# Altium PCB NB3000XN.PcbDoc (part 48 of 71)
Units mil, origin at the board's own origin, x right, y up, seen from the top; angles counter-clockwise.
Board outline 9527.56 x 6929.77 mil, 6 copper layers (Top Layer, GND+SHIELD, MidLayer1, MidLayer2, P2 - 3V3+5V0, Bottom Layer), stack 62.375 mil thick; 832 components, 1027 nets, 4655 pads, 4981 vias.
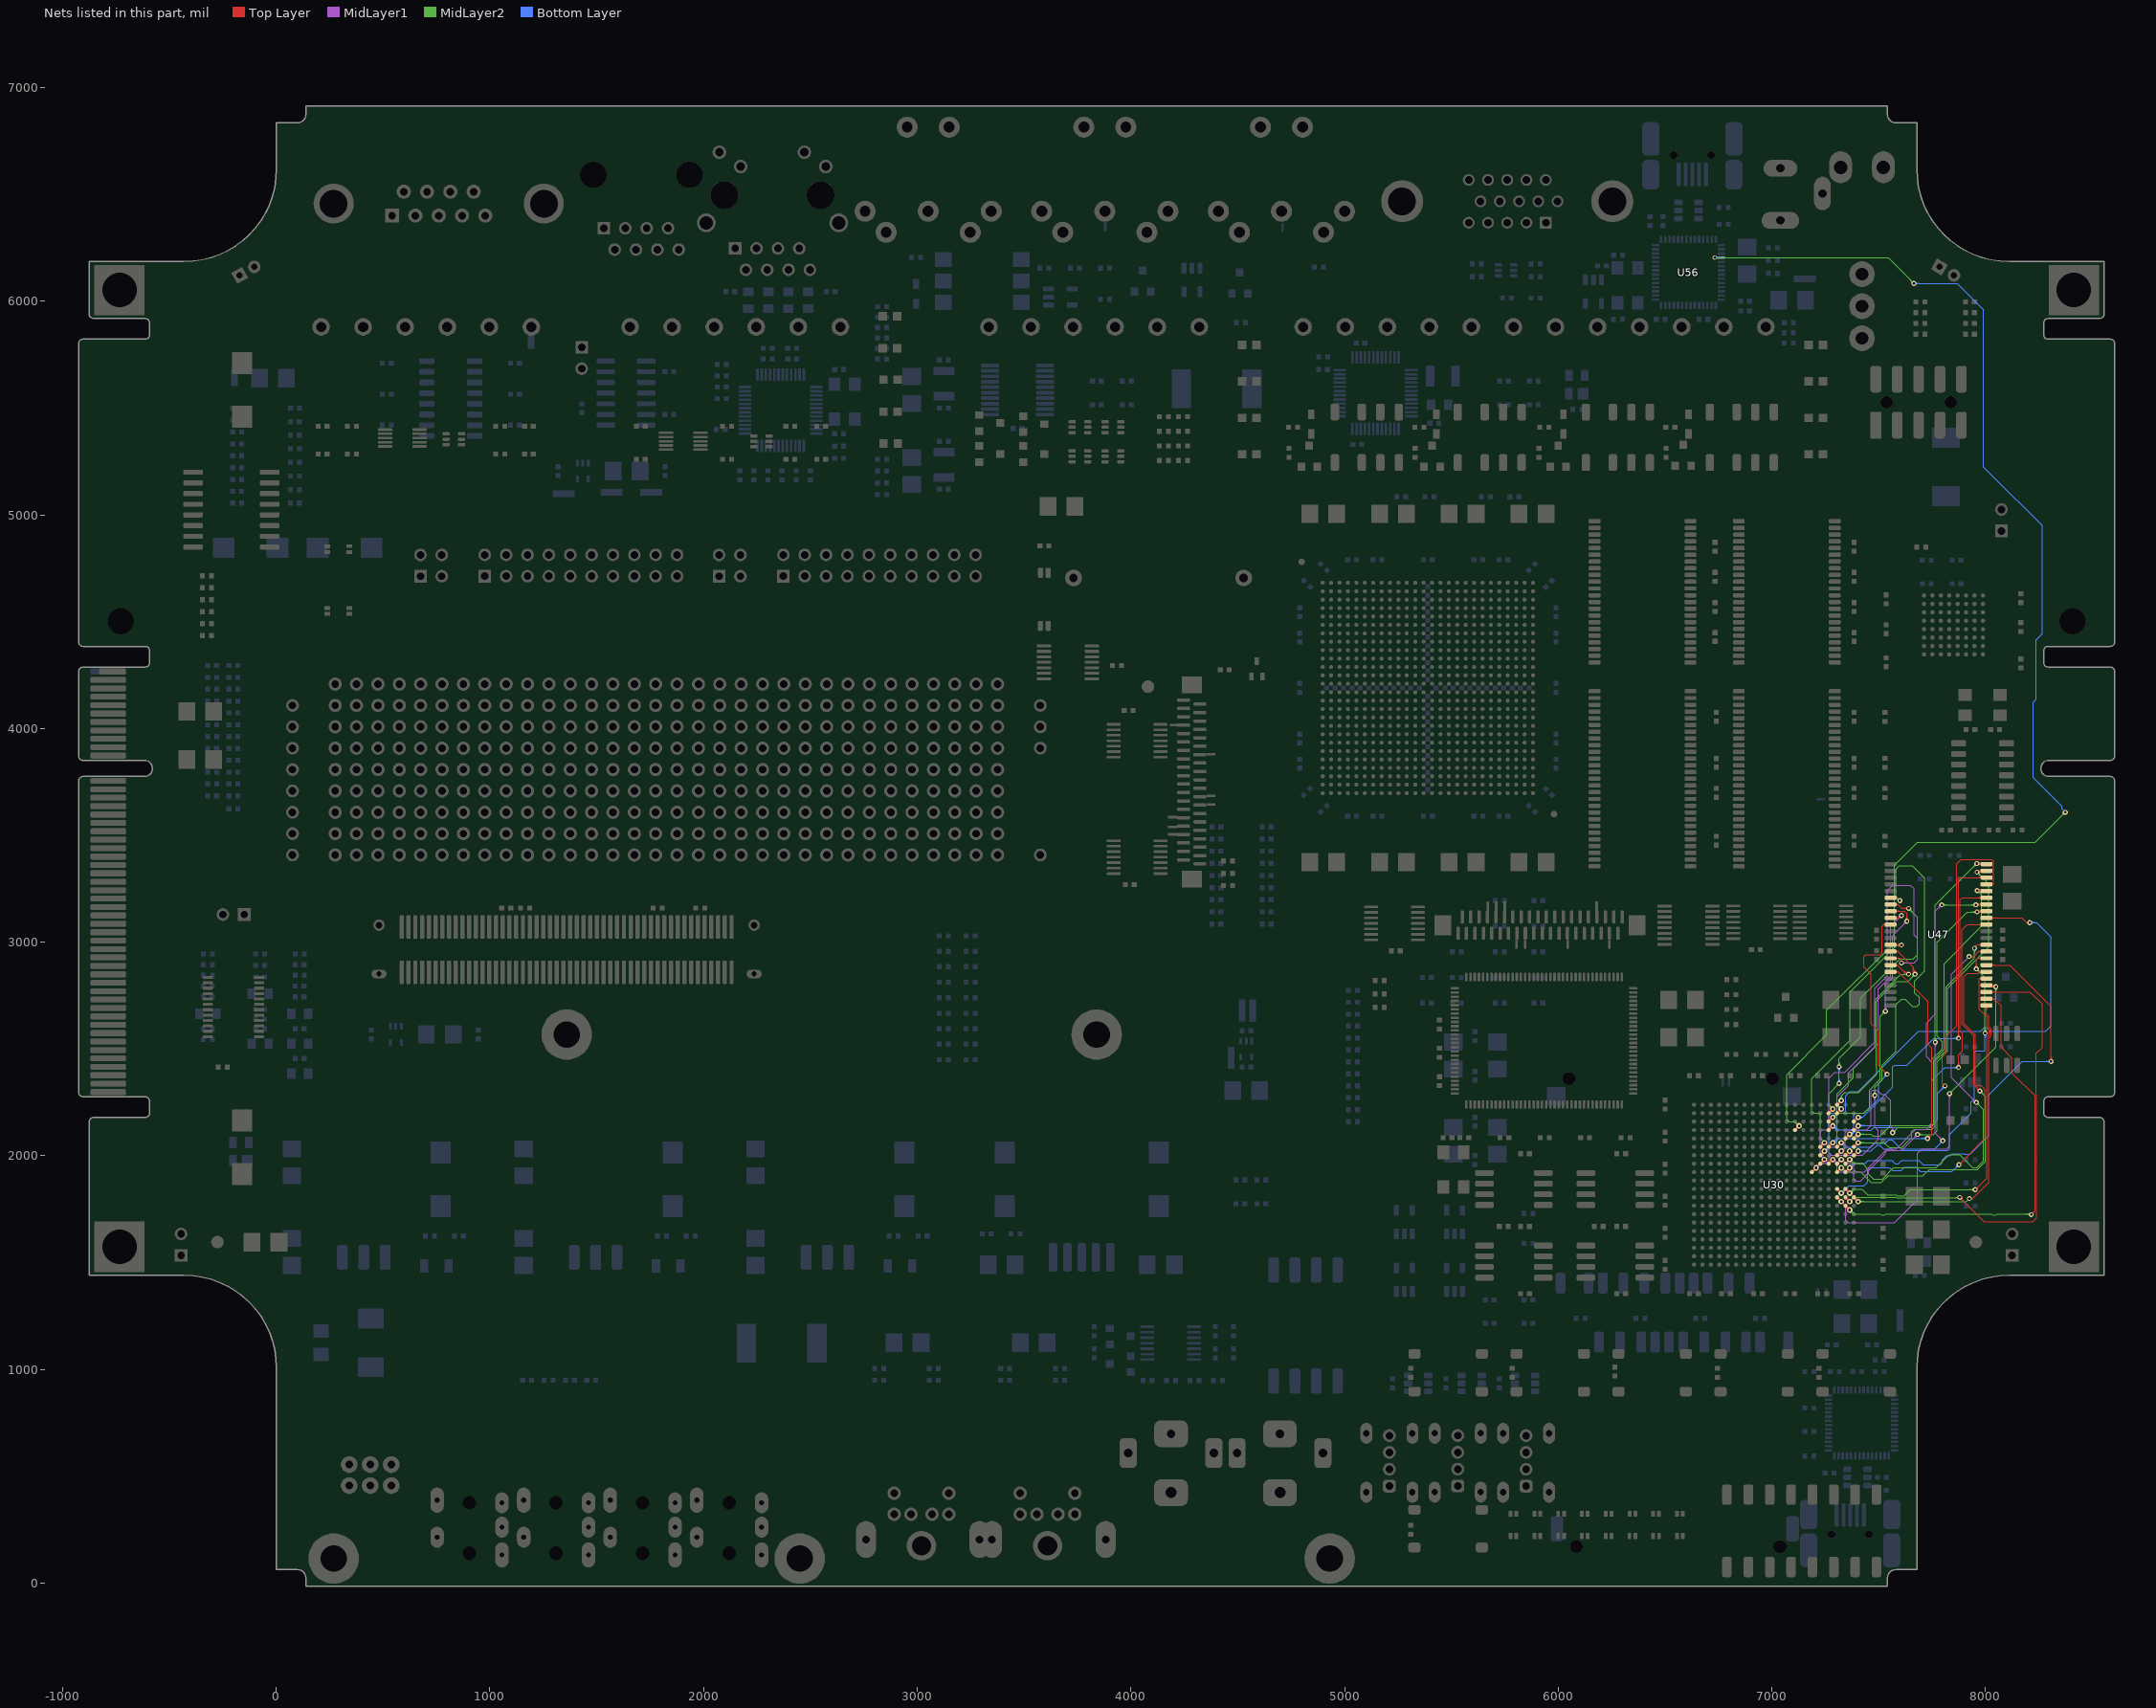
[diagram p52: the nets of this part, all layers, seen from the top]

## Via types
v1: diameter 23, hole 11.81, Top Layer to Bottom Layer, 3672 vias
v2: diameter 26, hole 11.81, Top Layer to Bottom Layer, 461 vias
v3: diameter 19, hole 11.81, Top Layer to Bottom Layer, tented both sides, 396 vias
v4: diameter 23.62, hole 11.81, Top Layer to Bottom Layer, 288 vias
v5: diameter 20, hole 11.81, Top Layer to Bottom Layer, 91 vias
v6: diameter 23, hole 11.81, Top Layer to Bottom Layer, tented both sides, 50 vias
v7: diameter 31, hole 11.81, Top Layer to Bottom Layer, 15 vias
v8: diameter 27.56, hole 11.81, Top Layer to Bottom Layer, tented both sides, 4 vias
v9: diameter 29, hole 11.81, Top Layer to Bottom Layer, 3 vias
v10: diameter 21, hole 11.81, Top Layer to Bottom Layer, 1 vias

## Nets (pads, with @x,y where several pads share a name; then routed paths per layer and width w, separated by ;. In a path a pad name is that pad's centre, name@x,y a point inside that pad or via, vN(x,y) a via of type N, cw(c..) or ccw(c..) an arc to the next point about the centre after c; other vN are vias at no path point) (continued)
HOST_SRAM.A10: U30.A12 U47.23 | length 1673.8
  Top Layer w4: v1(7924.52,1800.04) 7940.19,1800.04 8015.19,1875.04 8015.19,2551.39 8026.19,2562.39 8026.19,2593.36 8015.19,2604.36 8015.19,2652.98 8004.41,2663.76 U47.23@8004.41,2704.29 ; U47.23@7998.75,2698.64 cw(c7985.1,2684.98) 8004.41,2684.98 cw(c8023.72,2684.98) U47.23@8010.07,2698.64
  Top Layer w8: U30.A12@7384.02,1800.1 cw(c7384.02,1786) 7393.99,1795.97 cw(c7403.96,1805.94) U30.A12@7389.86,1805.94 ; U30.A12@7384.02,1805.94 v2(7403.7,1786.26) ; v2@7394.7,1786.26 ccw(c7372.97,1786.26) 7388.34,1801.62 ccw(c7403.7,1816.99) v2@7403.7,1795.26
  MidLayer2 w4: v2(7403.7,1786.26) 7910.74,1786.26 v1(7924.52,1800.04) ; v2@7408.65,1781.31 cw(c7420.6,1769.36) 7420.6,1786.26 cw(c7420.6,1803.16) v2@7408.65,1791.21 ; v2@7411.48,1778.48 cw(c7430.26,1759.7) 7430.26,1786.26 cw(c7430.26,1812.82) v2@7411.48,1794.04
HOST_SRAM.A11: U30.B13 U47.24 | length 2286.6
  Top Layer w4: U47.24@8004.41,2735.79 8038.52,2735.79 ; U47.24@8028.24,2730.82 cw(c8038.52,2722.66) 8038.52,2735.79 ; U47.24@8028.24,2740.76 ccw(c8038.52,2748.92) 8038.52,2735.79 ; v1(8213.86,1725.04) 8231.86,1743.04 8231.86,2280.52 8123.52,2388.85 8123.52,2458.37 8073.52,2508.37 8073.52,2700.79 8038.52,2735.79 ; v1@8213.86,1730.54 ccw(c8213.86,1743.82) 8223.25,1734.43 ccw(c8232.64,1725.04) v1@8219.36,1725.04 ; v1@8213.86,1734.54 ccw(c8213.86,1757.48) 8230.07,1741.26 ccw(c8246.29,1725.04) v1@8223.36,1725.04
  Top Layer w8: U30.B13@7344.65,1760.73 cw(c7344.65,1746.63) 7354.62,1756.6 cw(c7364.59,1766.57) U30.B13@7350.49,1766.57 ; U30.B13@7344.65,1766.57 v2(7364.33,1746.89) ; v2@7355.33,1746.89 ccw(c7333.6,1746.89) 7348.97,1762.25 ccw(c7364.33,1777.62) v2@7364.33,1755.89
  MidLayer2 w4: v2@7364.33,1735.89 cw(c7364.33,1709.33) 7383.11,1728.11 cw(c7401.89,1746.89) v2@7375.33,1746.89 ; v2@7364.33,1739.89 cw(c7364.33,1722.99) 7376.28,1734.94 cw(c7388.23,1746.89) v2@7371.33,1746.89 ; v2(7364.33,1746.89) 7383.51,1727.71 7507.1,1727.71 7512.62,1722.19 7527.38,1722.19 7532.9,1727.71 8027.1,1727.71 8032.62,1722.19 8047.38,1722.19 8052.9,1727.71 8211.19,1727.71 v1(8213.86,1725.04) ; 8184.48,1727.71 cw(c8184.48,1695.67) v1@8207.14,1718.32 ; 8194.14,1727.71 cw(c8194.14,1705.32) v1@8209.97,1721.15 ; 8197.36,1727.71 ccw(c8197.36,1741.54) v1@8207.14,1731.76
HOST_SRAM.A12: U30.B12 U47.25 | length 2457.9
  Top Layer w4: v1@7879.86,1795.87 cw(c7879.86,1772.94) 7896.07,1789.16 cw(c7912.29,1805.37) v1@7889.36,1805.37 ; v1@7879.86,1799.87 cw(c7879.86,1786.6) 7889.25,1795.99 cw(c7898.64,1805.37) v1@7885.36,1805.37 ; v1(7879.86,1805.37) 7993.52,1691.71 8221.86,1691.71 8240.19,1710.04 8240.19,1977.41 8240.03,1977.57 8240.03,1989.17 8240.19,1989.34 8240.19,2283.5 8237,2286.69 8237,2479.85 8265.19,2508.04 8265.19,2709.81 8207.72,2767.28 U47.25@8004.41,2767.28 ; U47.25@8027.63,2761.63 cw(c8041.28,2747.97) 8041.28,2767.28 cw(c8041.28,2786.6) U47.25@8027.63,2772.94
  Top Layer w8: U30.B12@7344.65,1800.1 cw(c7344.65,1786) 7354.62,1795.97 cw(c7364.59,1805.94) U30.B12@7350.49,1805.94 ; U30.B12@7344.65,1805.94 v2(7364.33,1786.26) ; v2@7355.33,1786.26 ccw(c7333.6,1786.26) 7348.97,1801.62 ccw(c7364.33,1816.99) v2@7364.33,1795.26
  MidLayer2 w4: v2(7364.33,1786.26) 7364.56,1786.26 7383.67,1805.37 7583.12,1805.37 7584.31,1804.19 7878.67,1804.19 v1(7879.86,1805.37) ; 7854.06,1804.19 ccw(c7854.06,1831.17) v1@7873.14,1812.09 ; 7859.78,1804.19 cw(c7859.78,1785.3) v1@7873.14,1798.66 ; 7863.72,1804.19 ccw(c7863.72,1821.52) v1@7875.97,1809.26
HOST_SRAM.A13: U30.C12 U47.26 | length 2133.8
  Top Layer w4: U47.26@8004.41,2798.78 v1@8041.12,2798.78 ; U47.26@8007.71,2798.78 cw(c8007.71,2750.56) v1@8041.81,2784.66 ; U47.26@8017.37,2798.78 cw(c8017.37,2760.22) v1@8044.64,2787.49 ; U47.26@8027.03,2798.78 cw(c8027.03,2769.88) v1@8047.46,2790.31 ; U47.26@8027.66,2793.16 cw(c8041.12,2779.86) v1@8041.12,2798.78 ; U47.26@8027.66,2804.4 ccw(c8041.12,2817.7) v1@8041.12,2798.78 ; 8036.68,2798.78 cw(c8036.68,2779.53) v1@8050.29,2793.14 ; v1(8048.52,2791.37) v1@8041.12,2798.78
  Top Layer w8: U30.C12@7305.28,1800.1 cw(c7305.28,1786) 7315.25,1795.97 cw(c7325.22,1805.94) U30.C12@7311.12,1805.94 ; U30.C12@7305.28,1805.94 v2(7324.96,1786.26) ; v2@7315.96,1786.26 ccw(c7294.23,1786.26) 7309.6,1801.62 ccw(c7324.96,1816.99) v2@7324.96,1795.26
  MidLayer1 w4: v2(7324.96,1786.26) 7344.51,1766.71 7345.33,1765.89 7345.33,1699.65 7356.46,1688.52 7574.67,1688.52 7681.86,1795.71 7681.86,2011.71 7703.52,2033.37 7819.19,2033.37 7831.86,2046.04 v1(7831.86,2291.71) ; v1@7825.14,2284.99 cw(c7808.92,2268.77) 7831.86,2268.77 cw(c7854.79,2268.77) v1@7838.57,2284.99 ; v1@7827.97,2287.82 cw(c7818.58,2278.43) 7831.86,2278.43 cw(c7845.14,2278.43) v1@7835.75,2287.82
  MidLayer2 w4: v1(7831.86,2291.71) 8048.52,2508.37 v1(8048.52,2791.37) ; v1@7831.86,2297.21 ccw(c7831.86,2310.49) 7841.25,2301.1 ccw(c7850.64,2291.71) v1@7837.36,2291.71 ; v1@7831.86,2301.21 ccw(c7831.86,2324.14) 7848.07,2307.93 ccw(c7864.29,2291.71) v1@7841.36,2291.71 ; v1@8041.81,2784.66 cw(c8025.59,2768.44) 8048.52,2768.44 cw(c8071.46,2768.44) v1@8055.24,2784.66 ; v1@8044.64,2787.49 cw(c8035.25,2778.1) 8048.52,2778.1 cw(c8061.8,2778.1) v1@8052.41,2787.49
HOST_SRAM.A14: U30.B11 U47.27 | length 1976.1
  Top Layer w4: v1(7951.86,1841.71) 8006.86,1896.71 8006.86,2554.37 8017.86,2565.37 8017.86,2590.37 8006.86,2601.37 8006.86,2650 7970.19,2686.67 7970.19,2828.61 7971.86,2830.28 ; v1@7951.86,1847.21 ccw(c7951.86,1860.49) 7961.25,1851.1 ccw(c7970.64,1841.71) v1@7957.36,1841.71 ; v1@7951.86,1851.21 ccw(c7951.86,1874.14) 7968.07,1857.93 ccw(c7984.29,1841.71) v1@7961.36,1841.71 ; U47.27@7980.2,2825.82 ccw(c7971.86,2820.23) 7971.86,2830.28 ; U47.27@7980.2,2834.73 cw(c7971.86,2840.32) 7971.86,2830.28 ; U47.27@8004.41,2830.28 7971.86,2830.28
  Top Layer w8: U30.B11@7344.65,1839.47 cw(c7344.65,1825.37) 7354.62,1835.34 cw(c7364.59,1845.31) U30.B11@7350.49,1845.31 ; U30.B11@7344.65,1845.31 v2(7364.33,1825.63) ; v2@7355.33,1825.63 ccw(c7333.6,1825.63) 7348.97,1840.99 ccw(c7364.33,1856.36) v2@7364.33,1834.63
  MidLayer2 w4: v2(7364.33,1825.63) 7383.7,1845 7420.23,1845 7428.18,1837.05 7448.52,1816.71 7583.1,1816.71 7587.62,1812.19 7619.01,1812.19 7648.52,1841.71 v1(7951.86,1841.71) ; v2@7364.33,1832.63 ccw(c7364.33,1849.53) 7376.28,1837.58 ccw(c7388.23,1825.63) v2@7371.33,1825.63 ; v2@7364.33,1836.63 ccw(c7364.33,1863.19) 7383.11,1844.41 ccw(c7401.89,1825.63) v2@7375.33,1825.63 ; v1@7945.14,1834.99 ccw(c7928.92,1818.77) 7928.92,1841.71 ccw(c7928.92,1864.64) v1@7945.14,1848.43 ; v1@7947.97,1837.82 ccw(c7938.58,1828.43) 7938.58,1841.71 ccw(c7938.58,1854.99) v1@7947.97,1845.6
HOST_SRAM.A15: U30.A3 U47.42 | length 1813.2
  Top Layer w4: v1@7866.81,2556.76 ccw(c7850.59,2572.98) 7873.52,2572.98 ccw(c7896.46,2572.98) v1@7880.24,2556.76 ; v1@7869.64,2553.93 ccw(c7860.25,2563.32) 7873.52,2563.32 ccw(c7886.8,2563.32) v1@7877.41,2553.93 ; v1(7873.52,2550.04) 7873.52,3215 7873.52,3298.52 7877.72,3302.72 U47.42@8004.41,3302.72 ; U47.42@7981.19,3297.06 ccw(c7967.54,3283.4) 7967.54,3302.72 ccw(c7967.54,3322.03) U47.42@7981.19,3308.37
  Top Layer w8: U30.A3@7384.02,2160.28 v2(7403.7,2179.96) ; U30.A3@7384.02,2166.12 ccw(c7384.02,2180.22) 7393.99,2170.25 ccw(c7403.96,2160.28) U30.A3@7389.86,2160.28 ; v2@7394.7,2179.96 cw(c7372.97,2179.96) 7388.34,2164.6 cw(c7403.7,2149.23) v2@7403.7,2170.96
  Bottom Layer w4: v2(7403.7,2179.96) 7423.52,2179.96 ; v2@7413.03,2174.14 cw(c7423.52,2167.6) 7423.52,2179.96 ; v2@7413.03,2185.78 ccw(c7423.52,2192.32) 7423.52,2179.96 ; v1@7866.81,2543.32 ccw(c7850.59,2527.11) 7850.59,2550.04 ccw(c7850.59,2572.98) v1@7866.81,2556.76 ; v1@7869.64,2546.15 ccw(c7860.25,2536.76) 7860.25,2550.04 ccw(c7860.25,2563.32) v1@7869.64,2553.93 ; v1(7873.52,2550.04) 7756.86,2550.04 7631.86,2425.04 7573.52,2425.04 7565.19,2416.71 7565.19,2321.63 7423.52,2179.96
HOST_SRAM.A16: U30.D8 U47.43 | length 2485.4
  Top Layer w4: v1(7959.86,3328.04) 7966.03,3334.21 U47.43@8004.41,3334.21 ; v1@7960.92,3326.98 cw(c7978.38,3309.52) U47.43@7978.38,3334.21 ; v1@7963.75,3324.15 cw(c7988.04,3299.86) U47.43@7988.04,3334.21 ; v1@7966.57,3321.32 cw(c7997.69,3290.21) U47.43@7997.69,3334.21 ; U47.43@7981.19,3328.56 ccw(c7967.54,3314.9) 7967.54,3334.21 ccw(c7967.54,3353.53) U47.43@7981.19,3339.87
  Top Layer w8: U30.D8@7265.91,1963.43 v2(7285.59,1983.11) ; U30.D8@7265.91,1969.27 ccw(c7265.91,1983.37) 7275.88,1973.4 ccw(c7285.85,1963.43) U30.D8@7271.75,1963.43 ; v2@7276.59,1983.11 cw(c7254.86,1983.11) 7270.23,1967.75 cw(c7285.59,1952.38) v2@7285.59,1974.11
  MidLayer1 w4: v2@7285.59,1972.11 cw(c7285.59,1945.55) 7304.37,1964.33 cw(c7323.15,1983.11) v2@7296.59,1983.11 ; v2@7285.59,1976.11 cw(c7285.59,1959.21) 7297.54,1971.16 cw(c7309.49,1983.11) v2@7292.59,1983.11 ; v2(7285.59,1983.11) 7305.86,1962.84 7305.86,1925.04 7306.19,1924.71 7373.52,1924.71 7383.52,1914.71 7383.52,1891.71 7391.86,1883.37 7415.19,1883.37 7453.52,1921.71 7453.52,1932.37 7529.88,2008.73 7529.88,2013.78 7541.15,2025.04 7606.86,2025.04 v1(7681.86,2100.04) ; v1@7672.36,2100.04 cw(c7649.42,2100.04) 7665.64,2083.82 cw(c7681.86,2067.61) v1@7681.86,2090.54 ; v1@7676.36,2100.04 cw(c7663.08,2100.04) 7672.47,2090.65 cw(c7681.86,2081.26) v1@7681.86,2094.54
  MidLayer2 w4: v1(7681.86,2100.04) 7755,2100.04 7773.19,2118.23 7773.19,2440.77 7823.52,2491.1 7823.52,2784.71 8015.19,2976.37 8015.19,3272.71 v1(7959.86,3328.04) ; v1@7685.75,2096.15 cw(c7695.14,2086.76) 7695.14,2100.04 cw(c7695.14,2113.32) v1@7685.75,2103.93 ; v1@7688.57,2093.32 cw(c7704.79,2077.11) 7704.79,2100.04 cw(c7704.79,2122.98) v1@7688.57,2106.76 ; v1@7959.86,3318.54 cw(c7959.86,3295.61) 7976.07,3311.82 cw(c7992.29,3328.04) v1@7969.36,3328.04 ; v1@7959.86,3322.54 cw(c7959.86,3309.26) 7969.25,3318.65 cw(c7978.64,3328.04) v1@7965.36,3328.04
HOST_SRAM.A17: U30.C6 U47.44 | length 2489.4
  Top Layer w4: v1(7959.52,3368.37) 7962.19,3365.71 U47.44@8004.41,3365.71 ; v1@7963.41,3372.26 ccw(c7979.24,3388.09) U47.44@7979.24,3365.71 ; v1@7966.24,3361.66 cw(c7976.02,3351.88) 7976.02,3365.71 ; v1@7966.24,3375.09 ccw(c7988.9,3397.75) U47.44@7988.9,3365.71 ; U47.44@7981.19,3360.05 ccw(c7967.54,3346.39) 7967.54,3365.71 ccw(c7967.54,3385.02) U47.44@7981.19,3371.37
  Top Layer w8: U30.C6@7305.28,2042.17 v2(7324.96,2061.85) ; U30.C6@7305.28,2048.01 ccw(c7305.28,2062.11) 7315.25,2052.14 ccw(c7325.22,2042.17) U30.C6@7311.12,2042.17 ; v2@7315.96,2061.85 cw(c7294.23,2061.85) 7309.6,2046.49 cw(c7324.96,2031.12) v2@7324.96,2052.85
  MidLayer1 w4: v1@7758.47,2524.99 cw(c7742.26,2508.77) 7765.19,2508.77 cw(c7788.13,2508.77) v1@7771.91,2524.99 ; v1@7761.3,2527.82 cw(c7751.91,2518.43) 7765.19,2518.43 cw(c7778.47,2518.43) v1@7769.08,2527.82 ; v1(7765.19,2531.71) 7765.19,2106.37 v1(7800.52,2071.04) ; v1@7791.02,2071.04 ccw(c7768.09,2071.04) 7784.31,2087.26 ccw(c7800.52,2103.48) v1@7800.52,2080.54 ; v1@7795.02,2071.04 ccw(c7781.75,2071.04) 7791.14,2080.43 ccw(c7800.52,2089.82) v1@7800.52,2076.54
  MidLayer2 w4: v1@7758.47,2538.43 ccw(c7742.26,2554.64) 7765.19,2554.64 ccw(c7788.13,2554.64) v1@7771.91,2538.43 ; v1@7761.3,2535.6 ccw(c7751.91,2544.99) 7765.19,2544.99 ccw(c7778.47,2544.99) v1@7769.08,2535.6 ; v1(7765.19,2531.71) 7765.19,3174.04 v1(7959.52,3368.37) ; v1@7950.02,3368.37 cw(c7927.09,3368.37) 7943.31,3352.16 cw(c7959.52,3335.94) v1@7959.52,3358.87 ; v1@7954.02,3368.37 cw(c7940.75,3368.37) 7950.14,3358.99 cw(c7959.52,3349.6) v1@7959.52,3362.87
  Bottom Layer w4: v2@7324.96,2050.85 cw(c7324.96,2024.29) 7343.74,2043.07 cw(c7362.52,2061.85) v2@7335.96,2061.85 ; v2@7324.96,2054.85 cw(c7324.96,2037.95) 7336.91,2049.9 cw(c7348.86,2061.85) v2@7331.96,2061.85 ; v2(7324.96,2061.85) 7345.1,2041.71 7465.19,2041.71 7481.86,2058.37 7532.11,2058.37 7548.28,2074.54 7562.77,2074.54 7603.94,2033.37 7762.86,2033.37 v1(7800.52,2071.04) ; v1@7791.02,2071.04 cw(c7768.09,2071.04) 7784.31,2054.82 cw(c7800.52,2038.61) v1@7800.52,2061.54 ; v1@7795.02,2071.04 cw(c7781.75,2071.04) 7791.13,2061.65 cw(c7800.52,2052.26) v1@7800.52,2065.54
HOST_SRAM.A18: U30.C11 U47.28 | length 2072.5
  Top Layer w4: v1(7876.19,1958.37) 7998.52,2080.71 7998.52,2310 7978.52,2330 7957.88,2330 7953,2334.88 7953,2540 ; v1@7876.19,1963.87 ccw(c7876.19,1977.15) 7885.58,1967.76 ccw(c7894.97,1958.37) v1@7881.69,1958.37 ; v1@7876.19,1967.87 ccw(c7876.19,1990.81) 7892.41,1974.59 ccw(c7908.63,1958.37) v1@7885.69,1958.37 ; 7953,2562 7953,2540 ; U47.28@7980.23,2857.29 ccw(c7971.77,2851.56) 7971.77,2861.77 ; U47.28@7980.23,2866.26 cw(c7971.77,2871.98) 7971.77,2861.77 ; U47.28@8004.41,2861.77 7971.77,2861.77 ; 7953,2540 7953,2565.21 7898.19,2620.02 7898.19,2838 7915.19,2855 7965,2855 7971.77,2861.77
  Top Layer w8: U30.C11@7305.28,1839.47 cw(c7305.28,1825.37) 7315.25,1835.34 cw(c7325.22,1845.31) U30.C11@7311.12,1845.31 ; U30.C11@7305.28,1845.31 v2(7324.96,1825.63) ; v2@7315.96,1825.63 ccw(c7294.23,1825.63) 7309.6,1840.99 ccw(c7324.96,1856.36) v2@7324.96,1834.63
  Bottom Layer w4: v2(7324.96,1825.63) 7360.33,1861 7430.96,1861 7448.02,1878.06 7448.02,1929.27 7463.13,1944.37 7550.62,1944.37 7564.5,1930.5 7605.5,1930.5 7621.21,1946.21 7674.45,1946.21 7694.66,1926 7843.82,1926 v1(7876.19,1958.37) ; v2@7324.96,1832.63 ccw(c7324.96,1849.53) 7336.91,1837.58 ccw(c7348.86,1825.63) v2@7331.96,1825.63 ; v2@7324.96,1836.63 ccw(c7324.96,1863.19) 7343.74,1844.41 ccw(c7362.52,1825.63) v2@7335.96,1825.63 ; v1@7866.69,1958.37 cw(c7843.76,1958.37) 7859.97,1942.16 cw(c7876.19,1925.94) v1@7876.19,1948.87 ; v1@7870.69,1958.37 cw(c7857.41,1958.37) 7866.8,1948.99 cw(c7876.19,1939.6) v1@7876.19,1952.87
HOST_SRAM.D0: U30.D2 U47.7 | length 1782
  Top Layer w4: U47.7@7555.59,3176.73 7589.52,3176.73 ; U47.7@7579.46,3171.82 cw(c7589.52,3163.97) 7589.52,3176.73 ; U47.7@7579.46,3181.65 ccw(c7589.52,3189.49) 7589.52,3176.73 ; v1@7633.47,3151.66 ccw(c7617.26,3135.44) 7617.26,3158.37 ccw(c7617.26,3181.31) v1@7633.47,3165.09 ; v1@7636.3,3154.49 ccw(c7626.91,3145.1) 7626.91,3158.37 ccw(c7626.91,3171.65) v1@7636.3,3162.26 ; v1(7640.19,3158.37) 7607.88,3158.37 7589.52,3176.73
  Top Layer w8: U30.D2@7265.91,2199.65 v2(7285.59,2219.33) ; U30.D2@7265.91,2205.49 ccw(c7265.91,2219.59) 7275.88,2209.62 ccw(c7285.85,2199.65) U30.D2@7271.75,2199.65 ; v2@7276.59,2219.33 cw(c7254.86,2219.33) 7270.23,2203.97 cw(c7285.59,2188.6) v2@7285.59,2210.33
  MidLayer2 w4: v2@7274.59,2219.33 ccw(c7248.03,2219.33) 7266.81,2238.11 ccw(c7285.59,2256.89) v2@7285.59,2230.33 ; v2@7278.59,2219.33 ccw(c7261.69,2219.33) 7273.64,2231.28 ccw(c7285.59,2243.23) v2@7285.59,2226.33 ; v2(7285.59,2219.33) 7266.52,2238.4 7266.52,2290.37 v1(7315.19,2339.04) ; v1@7305.69,2339.04 cw(c7282.76,2339.04) 7298.97,2322.82 cw(c7315.19,2306.61) v1@7315.19,2329.54 ; v1@7308.47,2423.43 ccw(c7292.26,2439.64) 7315.19,2439.64 ccw(c7338.13,2439.64) v1@7321.91,2423.43 ; v1@7309.69,2339.04 cw(c7296.41,2339.04) 7305.8,2329.65 cw(c7315.19,2320.26) v1@7315.19,2333.54 ; v1@7311.3,2420.6 ccw(c7301.91,2429.99) 7315.19,2429.99 ccw(c7328.47,2429.99) v1@7319.08,2420.6 ; v1(7315.19,2416.71) 7315.19,2456.06 7415.19,2556.06 7415.19,2737.71 7599.52,2922.04 7662.19,2922.04 7681.86,2941.71 7681.86,3116.71 v1(7640.19,3158.37) ; v1@7640.19,3148.87 cw(c7640.19,3125.94) 7656.41,3142.16 cw(c7672.63,3158.37) v1@7649.69,3158.37 ; v1@7640.19,3152.87 cw(c7640.19,3139.6) 7649.58,3148.99 cw(c7658.97,3158.37) v1@7645.69,3158.37
  Bottom Layer w4: v1@7308.47,2345.76 ccw(c7292.26,2361.98) 7315.19,2361.98 ccw(c7338.13,2361.98) v1@7321.91,2345.76 ; v1@7308.47,2409.99 cw(c7292.26,2393.77) 7315.19,2393.77 cw(c7338.13,2393.77) v1@7321.91,2409.99 ; v1@7311.3,2342.93 ccw(c7301.91,2352.32) 7315.19,2352.32 ccw(c7328.47,2352.32) v1@7319.08,2342.93 ; v1@7311.3,2412.82 cw(c7301.91,2403.43) 7315.19,2403.43 cw(c7328.47,2403.43) v1@7319.08,2412.82 ; v1(7315.19,2339.04) v1(7315.19,2416.71)
HOST_SRAM.D1: U30.D3 U47.8 | length 1662.2
  Top Layer w4: U47.8@7555.59,3145.24 7620,3145.24 7631.86,3133.37 v1(7631.86,3098.04) ; U47.8@7578.81,3139.58 cw(c7592.46,3125.92) 7592.46,3145.24 cw(c7592.46,3164.55) U47.8@7578.81,3150.89 ; v1@7625.14,3104.76 ccw(c7608.92,3120.98) 7631.86,3120.98 ccw(c7654.79,3120.98) v1@7638.57,3104.76 ; v1@7627.97,3101.93 ccw(c7618.58,3111.32) 7631.86,3111.32 ccw(c7645.14,3111.32) v1@7635.75,3101.93
  Top Layer w8: U30.D3@7265.91,2160.28 v2(7285.59,2179.96) ; U30.D3@7265.91,2166.12 ccw(c7265.91,2180.22) 7275.88,2170.25 ccw(c7285.85,2160.28) U30.D3@7271.75,2160.28 ; v2@7276.59,2179.96 cw(c7254.86,2179.96) 7270.23,2164.6 cw(c7285.59,2149.23) v2@7285.59,2170.96
  MidLayer1 w4: v1@7525.14,2683.43 ccw(c7508.92,2699.64) 7531.86,2699.64 ccw(c7554.79,2699.64) v1@7538.57,2683.43 ; v1@7527.97,2680.6 ccw(c7518.58,2689.99) 7531.86,2689.99 ccw(c7545.14,2689.99) v1@7535.75,2680.6 ; v1(7531.86,2676.71) 7531.86,2801.81 7564.86,2834.81 7564.86,3031.04 v1(7631.86,3098.04) ; v1@7622.36,3098.04 cw(c7599.42,3098.04) 7615.64,3081.82 cw(c7631.86,3065.61) v1@7631.86,3088.54 ; v1@7626.36,3098.04 cw(c7613.08,3098.04) 7622.47,3088.65 cw(c7631.86,3079.26) v1@7631.86,3092.54
  MidLayer2 w4: v2(7285.59,2179.96) 7305.67,2200.04 7431.86,2200.04 7456.86,2225.04 7456.86,2308.37 7506.86,2358.37 7506.86,2651.71 v1(7531.86,2676.71) ; v2@7285.59,2186.96 ccw(c7285.59,2203.86) 7297.54,2191.91 ccw(c7309.49,2179.96) v2@7292.59,2179.96 ; v2@7285.59,2190.96 ccw(c7285.59,2217.52) 7304.37,2198.74 ccw(c7323.15,2179.96) v2@7296.59,2179.96 ; v1@7522.36,2676.71 cw(c7499.42,2676.71) 7515.64,2660.49 cw(c7531.86,2644.27) v1@7531.86,2667.21 ; v1@7526.36,2676.71 cw(c7513.08,2676.71) 7522.47,2667.32 cw(c7531.86,2657.93) v1@7531.86,2671.21
HOST_SRAM.D2: U30.E7 U47.9 | length 1570.2
  Top Layer w4: U47.9@7555.59,3113.74 7595.56,3113.74 v1(7606.86,3125.04) ; U47.9@7578.81,3108.08 cw(c7592.46,3094.43) 7592.46,3113.74 cw(c7592.46,3133.05) U47.9@7578.81,3119.4
  Top Layer w8: U30.E7@7226.54,2002.8 v2(7246.22,2022.48) ; U30.E7@7226.54,2008.64 ccw(c7226.54,2022.74) 7236.51,2012.77 ccw(c7246.48,2002.8) U30.E7@7232.38,2002.8 ; v2@7237.22,2022.48 cw(c7215.49,2022.48) 7230.86,2007.12 cw(c7246.22,1991.75) v2@7246.22,2013.48
  MidLayer1 w4: v2(7246.22,2022.48) 7265.45,2041.71 7304.19,2041.71 7305.86,2043.37 7305.86,2276.37 7360.15,2330.67 7360.15,2388.84 7498.52,2527.21 7498.52,2779.79 7556.86,2838.12 7556.86,3075.04 v1(7606.86,3125.04) ; v2@7246.22,2029.48 ccw(c7246.22,2046.38) 7258.17,2034.43 ccw(c7270.12,2022.48) v2@7253.22,2022.48 ; v2@7246.22,2033.48 ccw(c7246.22,2060.04) 7265,2041.26 ; v2@7257.22,2022.48 cw(c7283.77,2022.48) 7265,2041.26 ; v1@7597.36,3125.04 cw(c7574.42,3125.04) 7590.64,3108.82 cw(c7606.86,3092.61) v1@7606.86,3115.54 ; v1@7601.36,3125.04 cw(c7588.08,3125.04) 7597.47,3115.65 cw(c7606.86,3106.26) v1@7606.86,3119.54
HOST_SRAM.D3: U30.D4 U47.10 | length 1589.1
  Top Layer w4: v1@7530.69,2382.04 ccw(c7507.76,2382.04) 7523.97,2398.26 ccw(c7540.19,2414.48) v1@7540.19,2391.54 ; U47.10@7531.35,3077.85 ccw(c7523.19,3072.48) 7523.19,3082.24 ; U47.10@7531.35,3086.64 cw(c7523.19,3092.01) 7523.19,3082.24 ; v1@7534.69,2382.04 ccw(c7521.41,2382.04) 7530.8,2391.43 ccw(c7540.19,2400.82) v1@7540.19,2387.54 ; v1(7540.19,2382.04) 7498.52,2423.71 7498.52,2586.04 7465.19,2619.37 7465.19,2850.04 7431.86,2883.37 7431.86,2933.37 7440.19,2941.71 7506.86,2941.71 7515.19,2950.04 7515.19,3074.24 7523.19,3082.24 ; U47.10@7555.59,3082.24 7523.19,3082.24
  Top Layer w8: U30.D4@7265.91,2120.91 v2(7285.59,2140.59) ; U30.D4@7265.91,2126.75 ccw(c7265.91,2140.85) 7275.88,2130.88 ccw(c7285.85,2120.91) U30.D4@7271.75,2120.91 ; v2@7276.59,2140.59 cw(c7254.86,2140.59) 7270.23,2125.23 cw(c7285.59,2109.86) v2@7285.59,2131.59
  Bottom Layer w4: v2@7285.59,2129.59 cw(c7285.59,2103.03) 7304.37,2121.81 cw(c7323.14,2140.59) v2@7296.59,2140.59 ; v2@7285.59,2133.59 cw(c7285.59,2116.69) 7297.54,2128.64 cw(c7309.49,2140.59) v2@7292.59,2140.59 ; v2(7285.59,2140.59) 7305.14,2121.04 7373.52,2121.04 7383.86,2131.37 7383.86,2191.71 7392.19,2200.04 7431.86,2200.04 7499.86,2268.04 7499.86,2341.71 v1(7540.19,2382.04) ; v1@7530.69,2382.04 cw(c7507.76,2382.04) 7523.97,2365.82 cw(c7540.19,2349.61) v1@7540.19,2372.54 ; v1@7534.69,2382.04 cw(c7521.41,2382.04) 7530.8,2372.65 cw(c7540.19,2363.26) v1@7540.19,2376.54
HOST_SRAM.D4: U30.E6 U47.13 | length 1379.6
  Top Layer w4: U47.13@7555.59,2987.76 7589.52,2987.76 ; U47.13@7579.46,2982.84 cw(c7589.52,2975) 7589.52,2987.76 ; U47.13@7579.46,2992.67 ccw(c7589.52,3000.51) 7589.52,2987.76 ; v1@7598.59,2982.03 ccw(c7590.57,2977.5) 7590.57,2986.71 ; v1@7598.59,2991.38 cw(c7590.57,2995.92) 7590.57,2986.71 ; v1(7606.86,2986.71) 7590.57,2986.71 ; 7589.52,2987.76 7590.57,2986.71
  Top Layer w8: U30.E6@7226.54,2042.17 v2(7246.22,2061.85) ; U30.E6@7226.54,2048.01 ccw(c7226.54,2062.11) 7236.51,2052.14 ccw(c7246.48,2042.17) U30.E6@7232.38,2042.17 ; v2@7237.22,2061.85 cw(c7215.49,2061.85) 7230.86,2046.49 cw(c7246.22,2031.12) v2@7246.22,2052.85
  MidLayer2 w4: v2(7246.22,2061.85) 7227.19,2080.88 7227.19,2191.71 7218.86,2200.04 7195.86,2200.04 7187.52,2208.37 7187.52,2362.33 7366.19,2541 7366.19,2767.71 7585.19,2986.71 ; v1@7599.87,2980.27 ccw(c7585.19,2966.75) 7585.19,2986.71 ; v1@7599.87,2993.14 cw(c7585.19,3006.66) 7585.19,2986.71 ; v1@7602.81,2982.98 ccw(c7594.31,2975.15) 7594.31,2986.71 ccw(c7594.31,2998.26) v1@7602.81,2990.43 ; v1(7606.86,2986.71) 7585.19,2986.71
HOST_SRAM.D5: U30.C1 U47.14 | length 1277.1
  Top Layer w4: U47.14@7555.59,2956.26 7588.82,2956.26 ; U47.14@7579.63,2951.57 cw(c7588.82,2944.92) 7588.82,2956.26 ; U47.14@7579.63,2960.95 ccw(c7588.82,2967.6) 7588.82,2956.26 ; 7661.86,2860.89 ccw(c7677.37,2860.89) v1@7668.81,2847.96 ; 7661.86,2868.33 ccw(c7682.29,2868.33) v1@7671.02,2851.29 ; 7661.86,2875.78 ccw(c7687.21,2875.78) v1@7673.22,2854.63 ; v1(7670.19,2850.04) 7661.86,2858.37 7661.86,2883.22 ; v1@7675.43,2857.96 cw(c7692.13,2883.22) 7661.86,2883.22 ; 7588.82,2956.26 7661.86,2883.22
  Top Layer w8: U30.C1@7305.28,2239.02 v2(7324.96,2258.7) ; U30.C1@7305.28,2244.86 ccw(c7305.28,2258.96) 7315.25,2248.99 ccw(c7325.22,2239.02) U30.C1@7311.12,2239.02 ; v2@7315.96,2258.7 cw(c7294.23,2258.7) 7309.6,2243.34 cw(c7324.96,2227.97) v2@7324.96,2249.7
  MidLayer2 w4: v2@7318.61,2267.68 ccw(c7309.92,2279.96) 7324.96,2279.96 ; v2@7320.92,2264.42 ccw(c7315.39,2272.23) 7324.96,2272.23 ccw(c7334.53,2272.23) v2@7329,2264.42 ; v2(7324.96,2258.7) 7324.96,2279.96 ; v2@7331.31,2267.68 cw(c7340,2279.96) 7324.96,2279.96 ; v1@7660.69,2850.04 cw(c7637.76,2850.04) 7653.97,2833.82 cw(c7670.19,2817.61) v1@7670.19,2840.54 ; v1@7664.69,2850.04 cw(c7651.41,2850.04) 7660.8,2840.65 cw(c7670.19,2831.26) v1@7670.19,2844.54 ; v1(7670.19,2850.04) 7636.86,2816.71 7581.86,2816.71 7490.19,2725.04 7490.19,2415 7490.52,2414.67 7490.52,2381.69 7405.21,2296.37 7380,2296.37 7341.37,2296.37 7324.96,2279.96
HOST_SRAM.D6: U30.E8 U47.15 | length 2250.2
  Top Layer w4: U47.15@7555.59,2924.76 7600.24,2924.76 7606.86,2918.14 v1(7606.86,2902.71) ; U47.15@7578.81,2919.11 cw(c7592.46,2905.45) 7592.46,2924.76 cw(c7592.46,2944.08) U47.15@7578.81,2930.42
  Top Layer w8: U30.E8@7226.54,1963.43 v2(7246.22,1983.11) ; U30.E8@7226.54,1969.27 ccw(c7226.54,1983.37) 7236.51,1973.4 ccw(c7246.48,1963.43) U30.E8@7232.38,1963.43 ; v2@7237.22,1983.11 cw(c7215.49,1983.11) 7230.86,1967.75 cw(c7246.22,1952.38) v2@7246.22,1974.11
  MidLayer1 w4: v2@7238.44,1990.89 ccw(c7234.22,1995.11) 7240.19,1995.11 ; v2(7246.22,1983.11) 7240.19,1983.11 7240.19,2000.04 7226.19,2014.04 7226.19,2116.71 7230.52,2121.04 7256.86,2121.04 7266.52,2130.71 7266.52,2364.04 7294.19,2391.71 7340.39,2391.71 7481.86,2533.17 7481.86,2560 7481.86,2785.75 7540.19,2844.08 7540.19,3241.71 7565.19,3266.71 7648.52,3266.71 7665.19,3250.04 7665.19,3033.37 7681.86,3016.71 7681.86,2919.37 7665.19,2902.71 v1(7606.86,2902.71) ; v1@7610.75,2898.82 cw(c7620.14,2889.43) 7620.14,2902.71 cw(c7620.14,2915.99) v1@7610.75,2906.6 ; v1@7613.57,2895.99 cw(c7629.79,2879.77) 7629.79,2902.71 cw(c7629.79,2925.64) v1@7613.57,2909.43
HOST_SRAM.D7: U30.C2 U47.16 | length 1229.1
  Top Layer w4: U47.16@7555.59,2893.27 7587.15,2893.27 ; U47.16@7580.04,2889.21 cw(c7587.15,2885.02) 7587.15,2893.27 ; U47.16@7580.04,2897.33 ccw(c7587.15,2901.52) 7587.15,2893.27 ; 7607.22,2873.2 ccw(c7640.19,2906.17) v1@7640.19,2859.54 ; 7614.05,2866.37 ccw(c7640.19,2892.51) v1@7640.19,2855.54 ; 7620.88,2859.54 ccw(c7640.19,2878.86) v1@7640.19,2851.54 ; 7627.7,2852.71 ccw(c7640.19,2865.2) v1@7640.19,2847.54 ; v1(7640.19,2850.04) 7630.38,2850.04 7587.15,2893.27
  Top Layer w8: U30.C2@7305.28,2199.65 v2(7324.96,2219.33) ; U30.C2@7305.28,2205.49 ccw(c7305.28,2219.59) 7315.25,2209.62 ccw(c7325.22,2199.65) U30.C2@7311.12,2199.65 ; v2@7315.96,2219.33 cw(c7294.23,2219.33) 7309.6,2203.97 cw(c7324.96,2188.6) v2@7324.96,2210.33
  MidLayer2 w4: v2@7313.96,2219.33 ccw(c7287.4,2219.33) 7306.18,2238.11 ccw(c7324.96,2256.89) v2@7324.96,2230.33 ; v2@7317.96,2219.33 ccw(c7301.06,2219.33) 7313.01,2231.28 ccw(c7324.96,2243.23) v2@7324.96,2226.33 ; v2(7324.96,2219.33) 7305.86,2238.43 7305.86,2290.71 7381.86,2366.71 7381.86,2408.37 7481.86,2508.37 7481.86,2729.37 7602.52,2850.04 v1(7640.19,2850.04) ; v1@7633.47,2843.32 ccw(c7617.26,2827.11) 7617.26,2850.04 ccw(c7617.26,2872.98) v1@7633.47,2856.76 ; v1@7636.3,2846.15 ccw(c7626.91,2836.76) 7626.91,2850.04 ccw(c7626.91,2863.32) v1@7636.3,2853.93
HOST_SRAM.D8: U30.B9 U47.29 | length 2236.8
  Top Layer w4: U47.29@8004.41,2893.27 8113.63,2893.27 8306.86,2700.04 v1(8306.86,2441.71) ; U47.29@8027.63,2887.61 cw(c8041.28,2873.95) 8041.28,2893.27 cw(c8041.28,2912.58) U47.29@8027.63,2898.92 ; v1@8300.14,2448.43 ccw(c8283.92,2464.64) 8306.86,2464.64 ccw(c8329.79,2464.64) v1@8313.57,2448.43 ; v1@8302.97,2445.6 ccw(c8293.58,2454.99) 8306.86,2454.99 ccw(c8320.14,2454.99) v1@8310.75,2445.6
  Top Layer w8: U30.B9@7344.65,1924.06 v2(7364.33,1943.74) ; U30.B9@7344.65,1929.9 ccw(c7344.65,1944) 7354.62,1934.03 ccw(c7364.59,1924.06) U30.B9@7350.49,1924.06 ; v2@7355.33,1943.74 cw(c7333.6,1943.74) 7348.97,1928.38 cw(c7364.33,1913.01) v2@7364.33,1934.74
  Bottom Layer w4: v2(7364.33,1943.74) 7384.63,1964.04 7437.54,1964.04 7451.87,1978.37 7562.11,1978.37 7567.5,1972.98 7567.5,1972.75 7577.75,1962.5 7592.25,1962.5 7607.96,1978.21 7687.71,1978.21 7707.92,1958 7787.09,1958 7798.36,1969.27 7798.36,1980.58 7817.98,2000.21 7833.89,2000.21 7844.5,2010.81 7902.67,2010.81 7905.98,2007.5 7924.4,2007.5 7927.46,2010.56 7930.71,2010.56 8015.19,2095.04 8015.19,2285.04 8171.86,2441.71 v1(8306.86,2441.71) ; v2@7364.33,1950.74 ccw(c7364.33,1967.64) 7376.28,1955.69 ccw(c7388.23,1943.74) v2@7371.33,1943.74 ; v2@7364.33,1954.74 ccw(c7364.33,1981.3) 7383.11,1962.52 ccw(c7401.88,1943.74) v2@7375.33,1943.74 ; v1@8300.14,2434.99 ccw(c8283.92,2418.77) 8283.92,2441.71 ccw(c8283.92,2464.64) v1@8300.14,2448.43 ; v1@8302.97,2437.82 ccw(c8293.58,2428.43) 8293.58,2441.71 ccw(c8293.58,2454.99) v1@8302.97,2445.6
HOST_SRAM.D9: U30.A7 U47.30 | length 1908.4
  Top Layer w4: v1@7950.14,2881.76 ccw(c7933.92,2897.98) 7956.86,2897.98 ccw(c7979.79,2897.98) v1@7963.57,2881.76 ; v1@7952.97,2878.93 ccw(c7943.58,2888.32) 7956.86,2888.32 ccw(c7970.14,2888.32) v1@7960.75,2878.93 ; v1(7956.86,2875.04) 7956.86,2916.43 7965.19,2924.76 U47.30@8004.41,2924.76 ; U47.30@7981.19,2919.11 ccw(c7967.54,2905.45) 7967.54,2924.76 ccw(c7967.54,2944.08) U47.30@7981.19,2930.42
  Top Layer w8: U30.A7@7384.02,2002.8 v2(7403.7,2022.48) ; U30.A7@7384.02,2008.64 ccw(c7384.02,2022.74) 7393.99,2012.77 ccw(c7403.96,2002.8) U30.A7@7389.86,2002.8 ; v2@7394.7,2022.48 cw(c7372.97,2022.48) 7388.34,2007.12 cw(c7403.7,1991.75) v2@7403.7,2013.48
  MidLayer2 w4: v1@7956.86,2865.54 cw(c7956.86,2842.61) 7973.07,2858.82 cw(c7989.29,2875.04) v1@7966.36,2875.04 ; v1@7956.86,2869.54 cw(c7956.86,2856.26) 7966.25,2865.65 cw(c7975.64,2875.04) v1@7962.36,2875.04 ; v1(7956.86,2875.04) 7998.52,2833.37 v1(7998.52,2575.04) ; v1@7991.81,2581.76 ccw(c7975.59,2597.98) 7998.52,2597.98 ccw(c8021.46,2597.98) v1@8005.24,2581.76 ; v1@7994.64,2578.93 ccw(c7985.25,2588.32) 7998.52,2588.32 ccw(c8011.8,2588.32) v1@8002.41,2578.93
  Bottom Layer w4: v2(7403.7,2022.48) 7465.3,2022.48 7492.86,2050.04 7505.52,2050.04 7523.35,2032.21 7559.29,2032.21 7566.46,2025.04 7823.86,2025.04 7831.86,2033.04 7831.86,2100.04 7931.86,2200.04 7931.86,2251.37 7948.52,2268.04 7948.52,2485.71 7954.52,2491.71 7995.86,2491.71 7998.52,2494.37 v1(7998.52,2575.04) ; v2@7408.65,2017.53 cw(c7420.6,2005.58) 7420.6,2022.48 cw(c7420.6,2039.38) v2@7408.65,2027.43 ; v2@7411.48,2014.7 cw(c7430.26,1995.93) 7430.26,2022.48 cw(c7430.26,2049.04) v2@7411.48,2030.26 ; v1@7991.81,2568.32 cw(c7975.59,2552.11) 7998.52,2552.11 cw(c8021.46,2552.11) v1@8005.24,2568.32 ; v1@7994.64,2571.15 cw(c7985.25,2561.76) 7998.52,2561.76 cw(c8011.8,2561.76) v1@8002.41,2571.15
HOST_SRAM.D10: U30.B8 U47.31 | length 2200.1
  Top Layer w4: v1(7923.52,2933.37) 7945.97,2933.37 7968.85,2956.26 ; U47.31@7980.91,2950.9 ccw(c7968.85,2940.01) 7968.85,2956.26 ; U47.31@7980.91,2961.62 cw(c7968.85,2972.51) 7968.85,2956.26 ; U47.31@8004.41,2956.26 7968.85,2956.26
  Top Layer w8: U30.B8@7344.65,1963.43 v2(7364.33,1983.11) ; U30.B8@7344.65,1969.27 ccw(c7344.65,1983.37) 7354.62,1973.4 ccw(c7364.59,1963.43) U30.B8@7350.49,1963.43 ; v2@7355.33,1983.11 cw(c7333.6,1983.11) 7348.97,1967.75 cw(c7364.33,1952.38) v2@7364.33,1974.11
  MidLayer1 w4: v1(7923.52,2933.37) 7923.37,2933.37 7840.19,2850.19 7840.19,2366.71 v1(7956.86,2250.04) ; v1@7947.36,2250.04 ccw(c7924.42,2250.04) 7940.64,2266.26 ccw(c7956.86,2282.48) v1@7956.86,2259.54 ; v1@7951.36,2250.04 ccw(c7938.08,2250.04) 7947.47,2259.43 ccw(c7956.86,2268.82) v1@7956.86,2255.54
  MidLayer2 w4: v2@7364.33,1972.11 cw(c7364.33,1945.55) 7383.11,1964.33 cw(c7401.89,1983.11) v2@7375.33,1983.11 ; v2@7364.33,1976.11 cw(c7364.33,1959.21) 7376.28,1971.16 cw(c7388.23,1983.11) v2@7371.33,1983.11 ; v2(7364.33,1983.11) 7383.4,1964.04 7423.52,1964.04 7448.52,1939.04 7448.52,1918.37 7475.19,1891.71 7517.56,1891.71 7569.85,1944 7769,1944 7830,2005 7878,2005 7939,1944 7958.54,1944 7991.19,1976.65 7991.19,2215.71 v1(7956.86,2250.04) ; v1@7956.86,2240.54 cw(c7956.86,2217.61) 7973.07,2233.82 cw(c7989.29,2250.04) v1@7966.36,2250.04 ; v1@7956.86,2244.54 cw(c7956.86,2231.26) 7966.25,2240.65 cw(c7975.64,2250.04) v1@7962.36,2250.04
HOST_SRAM.D11: U30.A6 U47.32 | length 1642
  Top Layer w4: v1(7948.52,2972.04) 7948.52,2974.37 7961.91,2987.76 U47.32@8004.41,2987.76 ; U47.32@7981.19,2982.1 ccw(c7967.54,2968.44) 7967.54,2987.76 ccw(c7967.54,3007.07) U47.32@7981.19,2993.41
  Top Layer w8: U30.A6@7384.02,2042.17 v2(7403.7,2061.85) ; U30.A6@7384.02,2048.01 ccw(c7384.02,2062.11) 7393.99,2052.14 ccw(c7403.96,2042.17) U30.A6@7389.86,2042.17 ; v2@7394.7,2061.85 cw(c7372.97,2061.85) 7388.34,2046.49 cw(c7403.7,2031.12) v2@7403.7,2052.85
  MidLayer2 w4: v2(7403.7,2061.85) 7525.72,2061.85 7549.18,2038.39 7608.39,2038.39 7655,2085 7655,2115.04 7665,2125.04 7750,2125.04 7750,2125.37 7765,2140.37 7765,2150 ; v2@7408.65,2056.9 cw(c7420.6,2044.95) 7420.6,2061.85 cw(c7420.6,2078.75) v2@7408.65,2066.8 ; v2@7411.48,2054.07 cw(c7430.26,2035.3) 7430.26,2061.85 cw(c7430.26,2088.41) v2@7411.48,2069.63 ; 7765.19,2150 7765.19,2444.08 7815.19,2494.08 7815.19,2791.71 7948.52,2925.04 v1(7948.52,2972.04) ; v1@7941.81,2965.32 cw(c7925.59,2949.11) 7948.52,2949.11 cw(c7971.46,2949.11) v1@7955.24,2965.32 ; v1@7944.64,2968.15 cw(c7935.25,2958.76) 7948.52,2958.76 cw(c7961.8,2958.76) v1@7952.41,2968.15
HOST_SRAM.D12: U30.C9 U47.35 | length 2294.2
  Top Layer w4: v1@7964.02,2303.04 ccw(c7941.09,2303.04) 7957.31,2319.26 ccw(c7973.52,2335.48) v1@7973.52,2312.54 ; v1@7968.02,2303.04 ccw(c7954.75,2303.04) 7964.14,2312.43 ccw(c7973.52,2321.82) v1@7973.52,2308.54 ; v1(7973.52,2303.04) 7945,2331.56 7945,2561.9 7890.19,2616.71 7890.19,3058.37 7914.06,3082.24 U47.35@8004.41,3082.24 ; U47.35@7981.19,3076.59 ccw(c7967.54,3062.93) 7967.54,3082.24 ccw(c7967.54,3101.56) U47.35@7981.19,3087.9
  Top Layer w8: U30.C9@7305.28,1924.06 v2(7324.96,1943.74) ; U30.C9@7305.28,1929.9 ccw(c7305.28,1944) 7315.25,1934.03 ccw(c7325.22,1924.06) U30.C9@7311.12,1924.06 ; v2@7315.96,1943.74 cw(c7294.23,1943.74) 7309.6,1928.38 cw(c7324.96,1913.01) v2@7324.96,1934.74
  MidLayer2 w4: v2@7324.96,1932.74 cw(c7324.96,1906.18) 7343.74,1924.96 cw(c7362.52,1943.74) v2@7335.96,1943.74 ; v2@7324.96,1936.74 cw(c7324.96,1919.84) 7336.91,1931.79 cw(c7348.86,1943.74) v2@7331.96,1943.74 ; v2(7324.96,1943.74) 7343.99,1924.71 7415.52,1924.71 7465.19,1875.04 7512.21,1875.04 7544.67,1907.5 7708.32,1907.5 7709.19,1908.37 7736.82,1936 7961.86,1936 7999.19,1973.33 7999.19,2277.37 v1(7973.52,2303.04) ; v1@7973.52,2293.54 cw(c7973.52,2270.61) 7989.74,2286.82 cw(c8005.96,2303.04) v1@7983.02,2303.04 ; v1@7973.52,2297.54 cw(c7973.52,2284.26) 7982.91,2293.65 cw(c7992.3,2303.04) v1@7979.02,2303.04
HOST_SRAM.D13: U30.B7 U47.36 | length 2551.8
  Top Layer w4: U47.36@8004.41,3113.74 8169.49,3113.74 8191.52,3091.71 v1(8207.19,3091.71) ; U47.36@8027.63,3108.08 cw(c8041.28,3094.43) 8041.28,3113.74 cw(c8041.28,3133.05) U47.36@8027.63,3119.4
  Top Layer w8: U30.B7@7344.65,2002.8 v2(7364.33,2022.48) ; U30.B7@7344.65,2008.64 ccw(c7344.65,2022.74) 7354.62,2012.77 ccw(c7364.59,2002.8) U30.B7@7350.49,2002.8 ; v2@7355.33,2022.48 cw(c7333.6,2022.48) 7348.97,2007.12 cw(c7364.33,1991.75) v2@7364.33,2013.48
  Bottom Layer w4: v2@7353.33,2022.48 cw(c7326.77,2022.48) 7345.55,2003.7 cw(c7364.33,1984.93) v2@7364.33,2011.48 ; v2@7357.33,2022.48 cw(c7340.43,2022.48) 7352.38,2010.53 cw(c7364.33,1998.58) v2@7364.33,2015.48 ; v2(7364.33,2022.48) 7345.23,2003.37 7277.52,2003.37 7266.52,2014.37 7266.52,2191.71 7274.86,2200.04 7336.86,2200.04 7345.19,2208.37 7345.19,2280.04 7365.19,2300.04 7403.19,2300.04 7686.52,2583.37 7977.52,2583.37 7994.19,2600.04 8004.86,2600.04 8021.52,2583.37 8281.86,2583.37 8306.86,2608.37 8306.86,3025.04 8240.19,3091.71 v1(8207.19,3091.71) ; v1@8211.08,3087.82 cw(c8220.47,3078.43) 8220.47,3091.71 cw(c8220.47,3104.99) v1@8211.08,3095.6 ; v1@8213.91,3084.99 cw(c8230.13,3068.77) 8230.13,3091.71 cw(c8230.13,3114.64) v1@8213.91,3098.43
HOST_SRAM.D14: U30.A5 U47.37 | length 1851.7
  Top Layer w4: v1(7960.52,3141.71) 7964.05,3145.24 U47.37@8004.41,3145.24 ; v1@7961.58,3140.65 cw(c7972.66,3129.57) 7972.66,3145.24 ; v1@7964.41,3137.82 cw(c7982.32,3119.91) U47.37@7982.32,3145.24 ; v1@7967.24,3134.99 cw(c7991.98,3110.26) U47.37@7991.98,3145.24 ; v1@7967.24,3148.43 ccw(c7974.94,3156.13) 7974.94,3145.24 ; U47.37@7981.19,3139.58 ccw(c7967.54,3125.92) 7967.54,3145.24 ccw(c7967.54,3164.55) U47.37@7981.19,3150.89
  Top Layer w8: U30.A5@7384.02,2081.54 v2(7403.7,2101.22) ; U30.A5@7384.02,2087.38 ccw(c7384.02,2101.48) 7393.99,2091.51 ccw(c7403.96,2081.54) U30.A5@7389.86,2081.54 ; v2@7394.7,2101.22 cw(c7372.97,2101.22) 7388.34,2085.86 cw(c7403.7,2070.49) v2@7403.7,2092.22
  MidLayer2 w4: v2(7403.7,2101.22) 7463.59,2101.22 7472.62,2092.19 7507.34,2092.19 7556.86,2141.71 7738.52,2141.71 7748.52,2151.71 7748.52,2450.04 7798.52,2500.04 7798.52,2535 7773.19,2560.33 7773.19,2999.71 7798.52,3025.04 7915.19,3141.71 v1(7960.52,3141.71) ; v2@7408.65,2096.27 cw(c7420.6,2084.32) 7420.6,2101.22 cw(c7420.6,2118.12) v2@7408.65,2106.17 ; v2@7411.48,2093.44 cw(c7430.26,2074.67) 7430.26,2101.22 cw(c7430.26,2127.78) v2@7411.48,2109 ; v1@7953.81,3134.99 ccw(c7937.59,3118.77) 7937.59,3141.71 ccw(c7937.59,3164.64) v1@7953.81,3148.43 ; v1@7956.64,3137.82 ccw(c7947.25,3128.43) 7947.25,3141.71 ccw(c7947.25,3154.99) v1@7956.64,3145.6
HOST_SRAM.D15: U30.C8 U47.38 | length 2233.8
  Top Layer w4: v1(7954.86,3175.04) 7956.55,3176.73 U47.38@8004.41,3176.73 ; v1@7958.75,3171.15 cw(c7972.22,3157.68) 7972.22,3176.73 ; v1@7961.57,3168.32 cw(c7981.87,3148.02) U47.38@7981.87,3176.73 ; v1@7961.57,3181.76 ccw(c7973.71,3193.89) 7973.71,3176.73 ; U47.38@7981.19,3171.08 ccw(c7967.54,3157.42) 7967.54,3176.73 ccw(c7967.54,3196.05) U47.38@7981.19,3182.39
  Top Layer w8: U30.C8@7305.28,1963.43 v2(7324.96,1983.11) ; U30.C8@7305.28,1969.27 ccw(c7305.28,1983.37) 7315.25,1973.4 ccw(c7325.22,1963.43) U30.C8@7311.12,1963.43 ; v2@7315.96,1983.11 cw(c7294.23,1983.11) 7309.6,1967.75 cw(c7324.96,1952.38) v2@7324.96,1974.11
  MidLayer1 w4: v2@7324.96,1972.11 cw(c7324.96,1945.55) 7343.74,1964.33 cw(c7362.52,1983.11) v2@7335.96,1983.11 ; v2@7324.96,1976.11 cw(c7324.96,1959.21) 7336.91,1971.16 cw(c7348.86,1983.11) v2@7331.96,1983.11 ; v2(7324.96,1983.11) 7344.03,1964.04 7373.52,1964.04 7384.52,1953.04 7384.52,1935.71 7395.52,1924.71 7433.19,1924.71 7521.88,2013.4 7521.88,2017.09 7538.17,2033.37 7582.86,2033.37 7668.51,2119.02 7674.48,2125 7724.84,2125 7748.86,2149.02 7748.86,2438.39 7723.52,2463.73 7723.52,2622.39 7765.19,2664.06 7765.19,3145.04 v1(7795.19,3175.04) ; v1@7785.69,3175.04 cw(c7762.76,3175.04) 7778.97,3158.82 cw(c7795.19,3142.61) v1@7795.19,3165.54 ; v1@7789.69,3175.04 cw(c7776.41,3175.04) 7785.8,3165.65 cw(c7795.19,3156.26) v1@7795.19,3169.54
  MidLayer2 w4: v1(7795.19,3175.04) v1(7954.86,3175.04) ; v1@7799.08,3171.15 cw(c7808.47,3161.76) 7808.47,3175.04 cw(c7808.47,3188.32) v1@7799.08,3178.93 ; v1@7801.91,3168.32 cw(c7818.13,3152.11) 7818.13,3175.04 cw(c7818.13,3197.98) v1@7801.91,3181.76 ; v1@7948.14,3168.32 ccw(c7931.92,3152.11) 7931.92,3175.04 ccw(c7931.92,3197.98) v1@7948.14,3181.76 ; v1@7950.97,3171.15 ccw(c7941.58,3161.76) 7941.58,3175.04 ccw(c7941.58,3188.32) v1@7950.97,3178.93
HOST_SRAM.NBHE: U30.C7 U47.40 | length 2490.5
  Top Layer w4: v1(7961.19,3241.71) 7971.52,3241.71 7973.51,3239.72 ; v1@7965.08,3245.6 ccw(c7979.26,3259.78) U47.40@7979.26,3239.72 ; v1@7967.91,3234.99 cw(c7979.34,3223.56) U47.40@7979.34,3239.72 ; v1@7967.91,3248.43 ccw(c7988.91,3269.43) U47.40@7988.91,3239.72 ; U47.40@7979.79,3235.96 ccw(c7973.51,3232.6) 7973.51,3239.72 ; U47.40@7979.79,3243.49 cw(c7973.51,3246.85) 7973.51,3239.72 ; U47.40@8004.41,3239.72 7973.51,3239.72
  Top Layer w8: U30.C7@7305.28,2002.8 v2(7324.96,2022.48) ; U30.C7@7305.28,2008.64 ccw(c7305.28,2022.74) 7315.25,2012.77 ccw(c7325.22,2002.8) U30.C7@7311.12,2002.8 ; v2@7315.96,2022.48 cw(c7294.23,2022.48) 7309.6,2007.12 cw(c7324.96,1991.75) v2@7324.96,2013.48
  MidLayer1 w4: v2(7324.96,2022.48) 7344.52,2042.04 7344.52,2108.71 7356.86,2121.04 7443.19,2121.04 7463.86,2141.71 7463.86,2300.04 7472.19,2308.37 7491.44,2308.37 7512.62,2287.19 7528.04,2287.19 7556.86,2258.37 7556.86,2138.73 7565.19,2130.39 ; v2@7324.96,2029.48 ccw(c7324.96,2046.38) 7336.91,2034.43 ccw(c7348.86,2022.48) v2@7331.96,2022.48 ; v2@7324.96,2033.48 ccw(c7324.96,2060.04) 7343.74,2041.26 ccw(c7362.51,2022.48) v2@7335.96,2022.48 ; v1@7558.75,2115.69 ccw(c7545.19,2130.39) 7565.19,2130.39 ; v1@7561.46,2112.75 ccw(c7553.61,2121.26) 7565.19,2121.26 ccw(c7576.77,2121.26) v1@7568.92,2112.75 ; v1(7565.19,2108.71) 7565.19,2130.39 ; v1@7571.63,2115.69 cw(c7585.19,2130.39) 7565.19,2130.39
  MidLayer2 w4: v1(7565.19,2108.71) 7589.86,2133.37 7745,2133.37 7745,2133.71 7756.86,2145.56 7756.86,2447.06 7806.86,2497.06 7806.86,2900.04 7981.86,3075.04 7981.86,3221.04 v1(7961.19,3241.71) ; v1@7565.19,2114.21 ccw(c7565.19,2127.49) 7574.58,2118.1 ccw(c7583.97,2108.71) v1@7570.69,2108.71 ; v1@7565.19,2118.21 ccw(c7565.19,2141.14) 7581.41,2124.93 ccw(c7597.63,2108.71) v1@7574.69,2108.71 ; v1@7961.19,3232.21 cw(c7961.19,3209.27) 7977.41,3225.49 cw(c7993.63,3241.71) v1@7970.69,3241.71 ; v1@7961.19,3236.21 cw(c7961.19,3222.93) 7970.58,3232.32 cw(c7979.97,3241.71) v1@7966.69,3241.71
HOST_SRAM.NBLE: U30.A4 U47.39 | length 1919.4
  Top Layer w4: v1@7866.81,2420.43 ccw(c7850.59,2436.64) 7873.52,2436.64 ccw(c7896.46,2436.64) v1@7880.24,2420.43 ; v1@7869.64,2417.6 ccw(c7860.25,2426.99) 7873.52,2426.99 ccw(c7886.8,2426.99) v1@7877.41,2417.6 ; v1(7873.52,2413.71) 7873.52,2474.04 7891.52,2492.04 7891.52,2575 7881.86,2584.67 7881.86,3198.23 7891.86,3208.23 U47.39@8004.41,3208.23 ; U47.39@7981.19,3202.57 ccw(c7967.54,3188.91) 7967.54,3208.23 ccw(c7967.54,3227.54) U47.39@7981.19,3213.88
  Top Layer w8: U30.A4@7384.02,2120.91 v2(7403.7,2140.59) ; U30.A4@7384.02,2126.75 ccw(c7384.02,2140.85) 7393.99,2130.88 ccw(c7403.96,2120.91) U30.A4@7389.86,2120.91 ; v2@7394.7,2140.59 cw(c7372.97,2140.59) 7388.34,2125.23 cw(c7403.7,2109.86) v2@7403.7,2131.59
  Bottom Layer w4: v2(7403.7,2140.59) 7415.19,2140.59 7416.31,2141.71 7736.86,2141.71 7748.52,2153.37 7748.52,2353.52 7808.71,2413.71 v1(7873.52,2413.71) ; v2@7408.65,2135.64 cw(c7423.3,2120.99) 7423.3,2141.71 ; v2@7408.65,2145.54 ccw(c7417.9,2154.79) 7417.9,2141.71 ; v2@7411.48,2132.81 cw(c7432.95,2111.34) 7432.95,2141.71 ; v2@7411.48,2148.37 ccw(c7427.56,2164.45) 7427.56,2141.71 ; v1@7866.81,2406.99 ccw(c7850.59,2390.77) 7850.59,2413.71 ccw(c7850.59,2436.64) v1@7866.81,2420.43 ; v1@7869.64,2409.82 ccw(c7860.25,2400.43) 7860.25,2413.71 ccw(c7860.25,2426.99) v1@7869.64,2417.6
HOST_SRAM.NCS: U30.F9 U47.6 | length 2495.5
  Top Layer w4: U47.6@7555.59,3208.23 7585.67,3208.23 ; U47.6@7580.41,3204.87 cw(c7585.67,3202.43) 7585.67,3208.23 ; U47.6@7580.41,3211.59 ccw(c7585.67,3214.03) 7585.67,3208.23 ; v1(7599.19,3194.71) 7585.67,3208.23
  Top Layer w8: U30.F9@7187.17,1924.06 v2(7206.85,1943.74) ; U30.F9@7187.17,1929.9 ccw(c7187.17,1944) 7197.14,1934.03 ccw(c7207.11,1924.06) U30.F9@7193.01,1924.06 ; v2@7197.85,1943.74 cw(c7176.12,1943.74) 7191.49,1928.38 cw(c7206.85,1913.01) v2@7206.85,1934.74
  MidLayer1 w4: v2(7206.85,1943.74) 7227.15,1964.04 7256.86,1964.04 7266.52,1973.71 7266.52,1991.71 7277.19,2002.37 7423.52,2002.37 7497.81,2076.66 7497.81,2117.38 7481.86,2133.33 v1(7481.86,2283.37) ; v2@7206.85,1950.74 ccw(c7206.85,1967.64) 7218.8,1955.69 ccw(c7230.75,1943.74) v2@7213.85,1943.74 ; v2@7206.85,1954.74 ccw(c7206.85,1981.3) 7225.63,1962.52 ccw(c7244.41,1943.74) v2@7217.85,1943.74 ; v1@7475.14,2276.66 cw(c7458.92,2260.44) 7481.86,2260.44 cw(c7504.79,2260.44) v1@7488.57,2276.66 ; v1@7477.97,2279.49 cw(c7468.58,2270.1) 7481.86,2270.1 cw(c7495.14,2270.1) v1@7485.75,2279.49
  MidLayer2 w4: v1@7475.14,2290.09 ccw(c7458.92,2306.31) 7481.86,2306.31 ccw(c7504.79,2306.31) v1@7488.57,2290.09 ; v1@7477.97,2287.26 ccw(c7468.58,2296.65) 7481.86,2296.65 ccw(c7495.14,2296.65) v1@7485.75,2287.26 ; v1(7481.86,2283.37) 7481.86,2322.06 7515.19,2355.39 7515.19,2423.37 7581.86,2490.04 7581.86,2708.37 7606.86,2733.37 7623.52,2733.37 7656.86,2700.04 7680.23,2700.04 7690,2709.81 7690,2741.71 7668.97,2762.74 7668.97,2818.78 7715.19,2865 7715.19,3300.04 7656.86,3358.37 7597.19,3358.37 7581.86,3343.04 7581.86,3212.04 v1(7599.19,3194.71) ; v1@7589.69,3194.71 ccw(c7566.76,3194.71) 7582.97,3210.93 ccw(c7599.19,3227.14) v1@7599.19,3204.21 ; v1@7593.69,3194.71 ccw(c7580.41,3194.71) 7589.8,3204.1 ccw(c7599.19,3213.49) v1@7599.19,3200.21
HOST_SRAM.NOE: U30.B5 U47.41 | length 2271.1
  Top Layer w4: v1(7810.52,2327.37) 7798.19,2339.71 7798.19,2463.19 7814.86,2479.86 7814.86,2558.04 7823.52,2566.71 7865.19,2608.37 7865.19,3366.37 7886.19,3387.37 8029.53,3387.37 8038.53,3378.37 8038.53,3272.89 8036.86,3271.22 ; U47.41@8004.41,3271.22 8036.86,3271.22 ; U47.41@8028.64,3266.8 cw(c8036.86,3261.36) 8036.86,3271.22 ; U47.41@8028.64,3275.64 ccw(c8036.86,3281.08) 8036.86,3271.22
  Top Layer w8: U30.B5@7344.65,2081.54 v2(7364.33,2101.22) ; U30.B5@7344.65,2087.38 ccw(c7344.65,2101.48) 7354.62,2091.51 ccw(c7364.59,2081.54) U30.B5@7350.49,2081.54 ; v2@7355.33,2101.22 cw(c7333.6,2101.22) 7348.97,2085.86 cw(c7364.33,2070.49) v2@7364.33,2092.22
  Bottom Layer w4: v2@7364.12,2100.24 ccw(c7367.94,2117.95) 7380.75,2105.14 ; v2(7364.33,2101.22) 7376.83,2101.22 7396.32,2120.71 ; v2@7364.96,2104.15 ccw(c7369.79,2126.48) 7385.94,2110.33 ; v2@7365.81,2108.06 ccw(c7371.63,2135.02) 7391.13,2115.52 ; v2@7366.65,2111.97 ccw(c7373.47,2143.55) 7396.32,2120.71 ; v1@7801.02,2327.37 cw(c7778.09,2327.37) 7794.31,2311.16 cw(c7810.52,2294.94) v1@7810.52,2317.87 ; v1@7805.02,2327.37 cw(c7791.75,2327.37) 7801.14,2317.99 cw(c7810.52,2308.6) v1@7810.52,2321.87 ; v1(7810.52,2327.37) 7775,2291.85 7775,2168.54 7739.84,2133.37 7478.19,2133.37 7465.52,2120.71 7396.32,2120.71
HOST_SRAM.NWE: U30.D6 U47.17 | length 1627.4
  Top Layer w4: U47.17@7555.59,2861.77 7591.15,2861.77 ; U47.17@7579.09,2856.41 cw(c7591.15,2845.52) 7591.15,2861.77 ; U47.17@7579.09,2867.13 ccw(c7591.15,2878.02) 7591.15,2861.77 ; v1(7728.52,2081.37) 7748.52,2101.37 7748.52,2505.39 7730.54,2523.38 7730.54,2722.39 7591.15,2861.77 ; v1@7728.52,2086.87 ccw(c7728.52,2100.15) 7737.91,2090.76 ccw(c7747.3,2081.37) v1@7734.02,2081.37 ; v1@7728.52,2090.87 ccw(c7728.52,2113.81) 7744.74,2097.59 ccw(c7760.96,2081.37) v1@7738.02,2081.37
  Top Layer w8: U30.D6@7265.91,2042.17 v2(7285.59,2061.85) ; U30.D6@7265.91,2048.01 ccw(c7265.91,2062.11) 7275.88,2052.14 ccw(c7285.85,2042.17) U30.D6@7271.75,2042.17 ; v2@7276.59,2061.85 cw(c7254.86,2061.85) 7270.23,2046.49 cw(c7285.59,2031.12) v2@7285.59,2052.85
  Bottom Layer w4: v2(7285.59,2061.85) 7305.12,2081.37 7543.8,2081.37 7544.96,2082.54 7727.36,2082.54 v1(7728.52,2081.37) ; v2@7285.59,2068.85 ccw(c7285.59,2085.75) 7297.54,2073.8 ; v2@7285.59,2072.85 ccw(c7285.59,2099.41) 7304.37,2080.63 ccw(c7323.14,2061.85) v2@7296.59,2061.85 ; v2@7292.59,2061.85 cw(c7309.49,2061.85) 7297.54,2073.8 ; 7702.77,2082.54 cw(c7702.77,2055.62) v1@7721.81,2074.66 ; 7708.4,2082.54 ccw(c7708.4,2101.49) v1@7721.81,2088.09 ; 7712.43,2082.54 cw(c7712.43,2065.28) v1@7724.64,2077.49
HOST_USB.D0: U30.H4 U56.18 | length 6682
  Top Layer w8: U30.H4@7108.43,2120.91 v2(7128.11,2140.59) ; U30.H4@7108.43,2126.75 ccw(c7108.43,2140.85) 7118.4,2130.88 ccw(c7128.37,2120.91) U30.H4@7114.27,2120.91 ; v2@7119.11,2140.59 cw(c7097.38,2140.59) 7112.75,2125.23 cw(c7128.11,2109.86) v2@7128.11,2131.59
  MidLayer2 w4: v5(6733,6203.9) 7544.67,6203.9 v1(7665.19,6083.37) ; v5@6738.66,6198.24 cw(c6752.31,6184.58) 6752.31,6203.9 cw(c6752.31,6223.21) v5@6738.66,6209.55 ; v2@7117.11,2140.59 ccw(c7090.55,2140.59) 7109.33,2159.37 ccw(c7128.11,2178.15) v2@7128.11,2151.59 ; v2@7121.11,2140.59 ccw(c7104.21,2140.59) 7116.16,2152.54 ccw(c7128.11,2164.49) v2@7128.11,2147.59 ; v2(7128.11,2140.59) 7107.99,2160.71 7080.86,2160.71 7069.52,2172.04 7069.52,2379.37 7256.86,2566.71 7256.86,2681.69 7573.52,2998.36 7573.52,3359.37 7680.86,3466.71 8231.86,3466.71 v1(8373.52,3608.37) ; v1@7655.69,6083.37 ccw(c7632.76,6083.37) 7648.97,6099.59 ccw(c7665.19,6115.81) v1@7665.19,6092.87 ; v1@7659.69,6083.37 ccw(c7646.41,6083.37) 7655.8,6092.76 ccw(c7665.19,6102.15) v1@7665.19,6088.87 ; v1@8364.02,3608.37 cw(c8341.09,3608.37) 8357.31,3592.16 cw(c8373.52,3575.94) v1@8373.52,3598.87 ; v1@8368.02,3608.37 cw(c8354.75,3608.37) 8364.14,3598.99 cw(c8373.52,3589.6) v1@8373.52,3602.87
  Bottom Layer w4: v1(7665.19,6083.37) 7867.59,6083.37 7990.81,5960.15 7990.81,5869.19 7990.81,5224.42 8024.41,5190.82 8265.19,4950.04 8265.19,4443.88 8237,4415.69 8237,4136.69 8223.36,4123.05 8223.36,3770.32 8357.84,3635.85 8357.84,3624.06 v1(8373.52,3608.37) ; v1@7669.08,6079.49 cw(c7678.47,6070.1) 7678.47,6083.37 cw(c7678.47,6096.65) v1@7669.08,6087.26 ; v1@7671.91,6076.66 cw(c7688.13,6060.44) 7688.13,6083.37 cw(c7688.13,6106.31) v1@7671.91,6090.09
  Bottom Layer w8: v5(6733,6203.9) U56.18@6764.33,6203.9 ; v5@6737.24,6199.65 cw(c6747.48,6189.41) 6747.48,6203.9 cw(c6747.49,6218.38) v5@6737.24,6208.14